# Altium PCB PCB1.PcbDoc (part 3 of 3)
Units mm, origin at the board's own origin, x right, y up, seen from the top; angles counter-clockwise.
Board outline 152.4 x 101.6 mm, 2 copper layers (Top Layer, Bottom Layer); 177 components, 83 nets, 484 pads, 115 vias.
Unrouted connection lines stored in the file: 7.
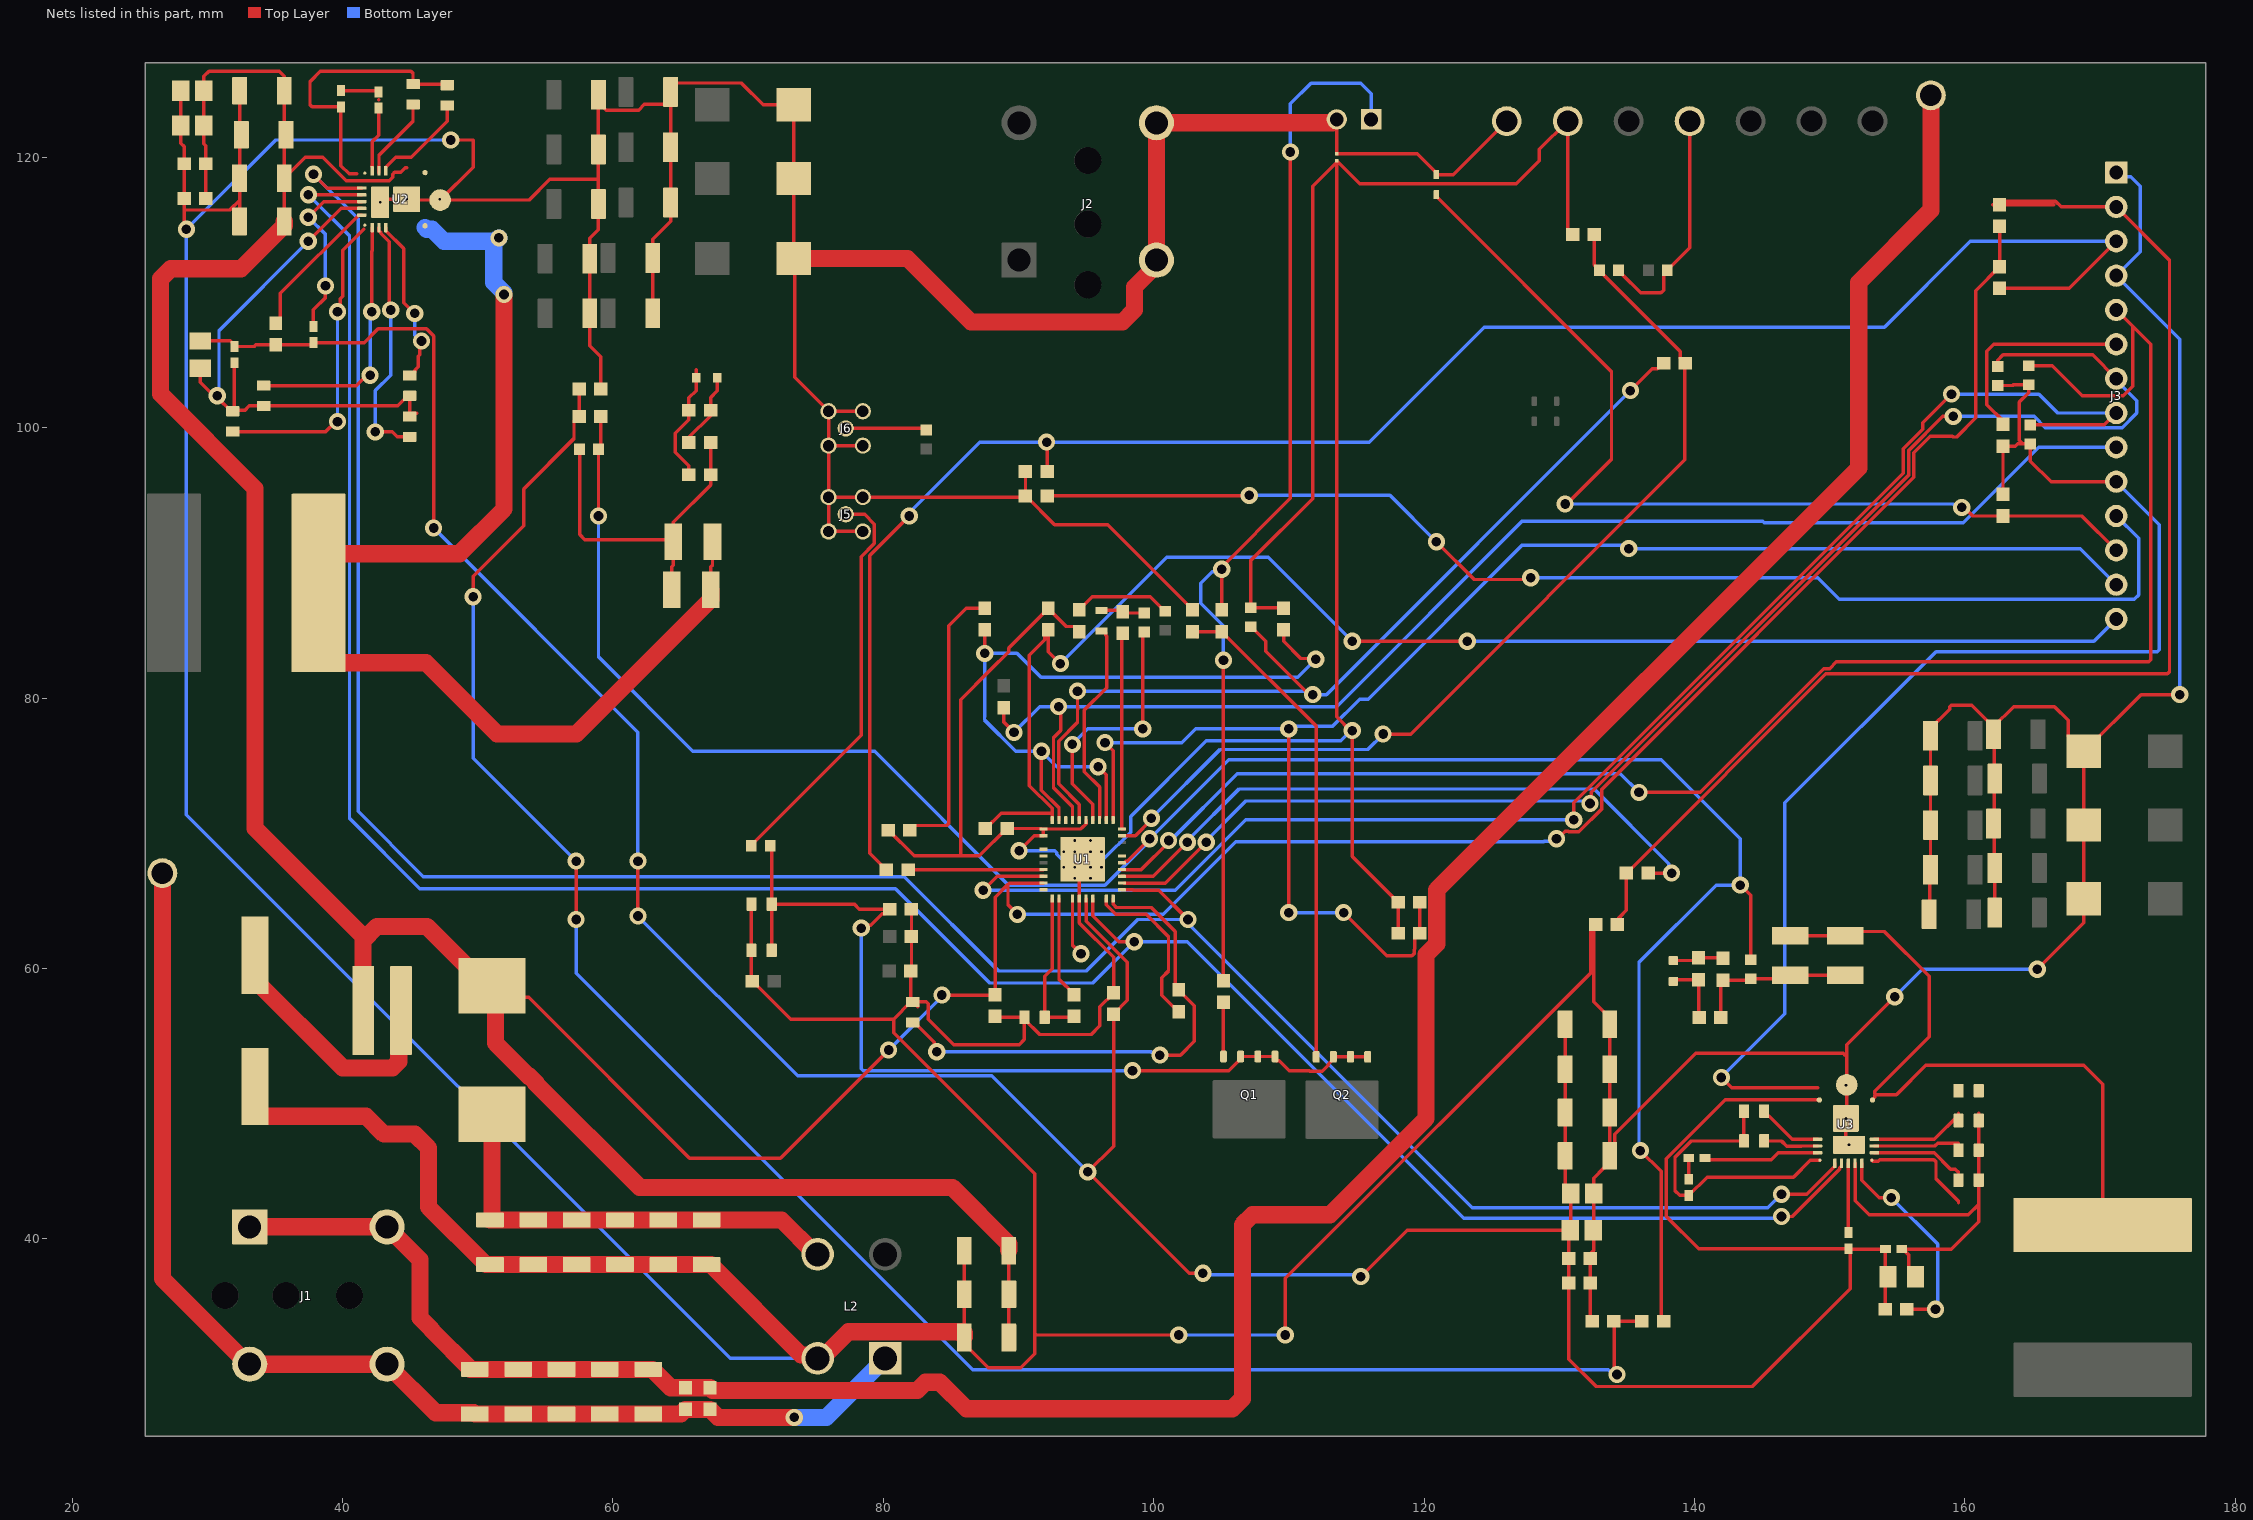
[diagram p2: the nets of this part, all layers, seen from the top]

## Via types
v1: diameter 1.27, hole 0.711, Top Layer to Bottom Layer, 97 vias
v2: diameter 0.5, hole 0.2, Top Layer to Bottom Layer, 18 vias

## Nets (pads, with @x,y where several pads share a name; then routed paths per layer and width w, separated by ;. In a path a pad name is that pad's centre, name@x,y a point inside that pad or via, vN(x,y) a via of type N, cw(c..) or ccw(c..) an arc to the next point about the centre after c; other vN are vias at no path point)
AGND: AGND_CTRL2.1 C32.2 C47.2 C51.2 C79.2 C80.2 NT2.2 R7.1 R17.1 R22.1 R54.1 U1.1 U1.2 U1.31 | length 199.4
  Top Layer w0.254: C80.2@80.353,70.231 80.378,70.231 82.283,68.326 85.725,68.326 ; v1(90.043,68.707) 91.158,69.822 U1.2@91.842,69.822 U1.1@91.842,70.322 ; R22.1@92.202,86.652 R22.1@92.202,86.627 ; R17.1@94.488,84.95 94.14,85.298 93.531,85.298 R22.1@92.202,86.627 ; U1.31@94.992,70.972 94.992,70.717 94.693,70.418 94.676,70.418 94.58,70.322 U1.1@91.842,70.322 ; C79.2@109.601,86.652 109.574,86.679 C32.2@107.188,86.679 107.188,90.183 111.76,94.755 111.76,117.856 113.538,119.634 ; C47.2@118.072,62.611 R7.1@118.072,64.897 118.047,64.897 117.699,65.245 117.699,65.27 114.681,68.288 v1(114.681,77.597) 114.554,77.597 113.538,78.613 113.538,119.634 ; R54.1@130.988,114.648 R54.1@130.988,114.543 ; R54.1@131.093,114.648 R54.1@130.988,114.543 ; 85.725,68.326 87.097,68.326 89.129,70.358 C51.2@89.154,70.358 91.635,70.358 91.671,70.322 U1.1@91.842,70.322 ; 85.725,68.326 85.725,79.883 87.884,82.042 89.281,83.439 89.281,83.706 R22.1@92.202,86.627 ; 113.538,119.634 NT2.2@113.538,119.761 115.248,118.051 126.814,118.051 128.524,119.761 128.524,120.587 AGND_CTRL2.1@130.619,122.682 130.619,114.648 130.968,114.3 R54.1@130.988,114.3 R54.1@130.988,114.543
  Bottom Layer w0.254: v1(90.043,68.707) 92.689,68.707 92.838,68.558 92.838,68.438 93.133,68.143 96.351,68.143 98.298,70.09 98.298,71.247 103.886,76.835 113.827,76.835 114.589,77.597 v1(114.681,77.597)
AGND2: C18.2 C19.2 R8.1 R10.1 R11.1 R15.1 U2.15 | length 42.9
  Top Layer w0.254: C19.2@29.464,104.394 29.464,103.357 30.459,102.362 v1(30.734,102.362) 30.734,102.237 31.752,101.219 R8.1@31.877,101.219 R8.1@31.935,101.277 ; C18.2@32.004,104.81 32.004,101.346 R8.1@31.935,101.277 ; v1(37.465,113.792) 39.901,116.228 U2.15@41.416,116.228 ; 45.484,101.074 45.206,101.074 R11.1@44.958,100.826 R15.1@44.958,102.362 44.833,102.362 44.083,101.612 R10.1@34.163,101.612 33.092,101.612 32.758,101.277 R8.1@31.935,101.277
  Bottom Layer w0.254: v1(30.734,102.362) 30.861,102.489 30.861,107.188 v1(37.465,113.792)
AGND3: C52.2 C53.2 R31.1 R32.1 R33.1 R40.1 U3.15 | length 29.6
  Top Layer w0.254: U3.15@151.873,45.596 151.873,42.818 152.908,41.783 160.26,41.783 161.024,42.547 ; C52.2@155.321,39.243 C52.2@155.421,39.243 ; C53.2@156.337,37.211 155.829,37.719 155.829,38.835 C52.2@155.421,39.243 ; 161.024,49.285 161.024,42.547 ; C52.2@155.421,39.243 159.004,39.243 161.024,41.263 161.024,42.547
COMP: C79.1 R60.2 U1.28 U1.35 | length 55.9
  Top Layer w0.254: v1(87.503,83.312) R60.2@87.503,85.052 ; v1(91.694,76.073) 91.694,73.183 92.992,71.885 U1.35@92.992,70.972 ; v1(95.885,74.93) 96.492,74.323 U1.28@96.492,70.972 ; C79.1@109.601,85.052 109.601,84.201 110.871,82.931 111.938,82.931 v1(111.989,82.88)
  Bottom Layer w0.254: v1(95.885,74.93) 92.837,74.93 v1(91.694,76.073) 89.789,76.073 87.481,78.381 87.481,78.591 87.503,78.613 v1(87.503,83.312) 89.885,83.312 91.663,81.534 110.642,81.534 v1(111.989,82.88)
EN1: R52.2 U1.20 | length 48
  Top Layer w0.254: U1.20@97.642,66.822 99.969,66.822 v1(102.489,69.342) ; R52.2@136.563,67.056 v1(138.303,67.056)
  Bottom Layer w0.254: v1(102.489,69.342) 102.489,69.463 106.305,73.279 132.588,73.279 138.109,67.758 138.109,67.25 v1(138.303,67.056)
EN2: R53.2 U1.6 | length 10.1
  Top Layer w0.254: R53.2@81.788,67.31 91.659,67.31 91.671,67.322 U1.6@91.842,67.322
FB: R50.1 R51.1 R54.2 U1.25 | length 72.7
  Top Layer w0.254: U1.25@97.642,69.822 98.651,69.822 99.822,70.993 v1(99.822,71.12) ; v1(116.967,77.343) 118.999,77.343 139.284,97.628 139.284,104.775 138.936,105.123 138.936,105.641 132.969,111.608 R51.1@132.969,111.633 132.969,111.658 132.588,112.039 R54.2@132.588,114.3
  Bottom Layer w0.254: v1(99.822,71.12) 104.902,76.2 115.824,76.2 v1(116.967,77.343)
GND: R23.1 R24.1 R25.1 | length 3.1
  Top Layer w0.254: R24.1@96.195,86.487 R23.1@97.686,86.487 ; R23.1@97.703,86.398 97.803,86.298 R25.1@99.314,86.298
HO1: U1.18 U2.12 U3.12 | length 184.5
  Top Layer w0.254: v1(37.846,118.745) 38.863,117.728 U2.12@41.416,117.728 ; U1.18@97.642,65.822 98.436,65.822 98.472,65.786 100.374,65.786 v1(102.533,63.627) ; v1(146.431,43.307) 148.305,43.307 150.373,45.375 U3.12@150.373,45.596
  Bottom Layer w0.254: v1(37.846,118.745) 41.148,115.443 41.148,71.628 45.974,66.802 81.534,66.802 88.519,59.817 94.996,59.817 98.806,63.627 v1(102.533,63.627) 102.533,63.352 102.848,63.036 102.848,63.014 123.571,42.291 145.415,42.291 v1(146.431,43.307)
HO2: U1.9
HS1: R4.1 R16.1 R18.1 U2.11 | length 21.5
  Top Layer w0.254: 41.066,118.778 40.48,118.778 39.878,119.38 R4.1@39.878,123.733 37.741,123.733 37.592,123.882 37.592,125.603 38.354,126.365 45.063,126.365 45.212,126.216 R18.1@45.212,125.414 R16.1@48.006,125.414
HS2: R28.1 R46.1 R47.1 U3.11 | length 22.2
  Top Layer w0.254: R46.1@143.649,49.448 R47.1@143.649,47.244 139.771,47.244 138.557,46.03 138.557,43.561 138.903,43.215 R28.1@139.573,43.215 140.935,44.577 147.32,44.577 148.564,45.821 U3.11@149.273,45.821
IMON1: C47.1 J3.13 R7.2 U1.27 | length 116.3
  Top Layer w0.254: v1(96.393,76.708) 96.992,76.109 U1.27@96.992,70.972 ; v1(109.982,64.135) v1(109.982,77.724) ; v1(114.046,64.135) 117.221,60.96 119.104,60.96 119.253,61.109 119.253,61.397 119.299,61.443 119.299,62.263 119.647,62.611 C47.1@119.672,62.611 R7.2@119.672,64.897
  Bottom Layer w0.254: v1(96.393,76.708) 102.086,76.708 103.102,77.724 v1(109.982,77.724) 110.176,77.918 113.224,77.918 115.239,79.933 115.874,79.933 127.265,91.324 134.863,91.324 v1(135.128,91.059) 168.529,91.059 J3.13@171.196,88.392 ; v1(109.982,64.135) v1(114.046,64.135)
IMON2: C51.1 J3.14 R22.2 U1.36 | length 108.2
  Top Layer w0.254: C51.1@87.554,70.358 87.579,70.358 88.716,71.495 92.492,71.495 ; U1.36@92.49,71.031 92.492,71.029 U1.36@92.492,70.972 ; U1.36@92.492,71.143 92.492,71.495 ; v1(93.091,82.55) 92.202,83.439 R22.2@92.202,85.052 91.953,84.802 91.953,84.32 90.805,83.172 90.805,73.533 92.492,71.846 92.492,71.495 ; v1(114.681,84.201) v1(123.19,84.201)
  Bottom Layer w0.254: v1(93.091,82.55) 100.965,90.424 108.458,90.424 v1(114.681,84.201) ; v1(123.19,84.201) 169.545,84.201 J3.14@171.196,85.852
ISNS1+: C49.2 C77.2 R20.1 R49.1 U1.22 | length 164.7
  Top Layer w0.254: v1(58.928,93.472) R20.1@58.928,98.425 59.093,98.59 C49.2@59.093,100.838 ; U1.22@97.815,67.824 97.934,67.943 98.042,67.943 v1(99.695,69.596) ; v1(135.998,46.535) 137.541,44.993 137.541,34.074 C77.2@137.706,33.909 ; v1(143.383,66.167) 144.145,65.405 R49.1@144.145,60.644
  Bottom Layer w0.254: v1(58.928,93.472) 58.928,83.058 65.913,76.073 79.35,76.073 89.256,66.167 96.393,66.167 99.695,69.469 v1(99.695,69.596) 105.537,75.438 137.541,75.438 143.383,69.596 v1(143.383,66.167) 141.605,66.167 135.89,60.452 135.89,46.644 v1(135.998,46.535)
ISNS2+: U1.4
LO1: U1.15 U2.13 U3.13 | length 183.5
  Top Layer w0.254: v1(37.472,117.228) U2.13@41.416,117.228 ; U1.15@95.492,65.172 95.492,63.893 97.409,61.976 v1(98.552,61.976) ; v1(146.431,41.656) 147.238,41.656 150.754,45.172 150.754,45.256 150.873,45.375 U3.13@150.873,45.596
  Bottom Layer w0.254: v1(37.472,117.228) 40.513,114.187 40.513,71.12 45.72,65.913 80.899,65.913 87.884,58.928 95.504,58.928 v1(98.552,61.976) 102.489,61.976 122.945,41.52 146.295,41.52 v1(146.431,41.656)
LO2: U1.12 | length 4.3
  Top Layer w0.254: U1.12@93.992,65.172 93.992,61.71 v1(94.615,61.087)
NetBODE2_1: BODE2.1 R36.1 R51.2 | length 17.4
  Top Layer w0.254: R51.2@134.369,111.633 134.369,111.608 134.642,111.335 134.667,111.335 136.02,109.982 137.519,109.982 137.714,110.177 137.714,111.36 R36.1@137.987,111.633 137.987,111.658 139.637,113.308 BODE2.1@139.637,122.682
NetC1_1: C1.1 R1.1 | length 19.2
  Top Layer w1.27: C1.1@33.528,60.984 33.528,59.134 40.01,52.652 43.688,52.652 44.156,53.121 44.156,54.926 44.321,55.091 R1.1@44.321,56.896
NetC5_2: C5.2 C9.2 C10.2 C11.2 C12.2 C13.2 L1.1 L2.3 | length 33
  Top Layer w1.27: L1.1@51.054,49.225 51.054,41.486 C13.2@50.969,41.401 ; L2.3@74.97,38.902 72.471,41.401 C10.2@66.929,41.401 C5.2@63.725,41.401 C9.2@60.521,41.401 C11.2@57.316,41.401 C12.2@54.112,41.401 C13.2@50.969,41.401 ; C13.2@50.969,41.401 C13.2@50.908,41.401 C13.2@50.969,41.401
NetC6_1: C6.1 C7.1 C8.1 C14.1 C15.1 C16.2 C17.2 GND1.1 J1.2 L2.1 | length 89.7
  Top Layer w1.27: GND1.1@26.67,67.056 26.67,37.07 J1.2@33.006,30.734 ; J1.2@33.133,30.734 J1.2@43.293,30.734 46.89,27.137 49.699,27.137 C8.1@49.784,27.052 C7.1@52.988,27.052 C6.1@56.192,27.052 C14.1@59.397,27.052 C15.1@62.611,27.052 65.026,27.052 C17.2@65.368,27.394 C16.2@67.183,27.394 67.78,26.797 v1(73.406,26.797)
  Bottom Layer w1.27: v1(73.406,26.797) 75.772,26.797 L2.1@80.137,31.162
NetC6_2: C6.2 C7.2 C8.2 C14.2 C15.2 C16.1 C17.1 J1.1 VIN1.1 | length 203.2
  Top Layer w1.27: J1.1@33.133,40.894 J1.1@43.293,40.894 45.72,38.467 45.72,34.163 46.609,33.274 46.609,33.222 49.479,30.352 C8.2@49.784,30.352 C7.2@52.988,30.352 C6.2@56.192,30.352 C14.2@59.397,30.352 C15.2@62.611,30.352 62.916,30.352 64.274,28.994 C17.1@65.368,28.994 C16.1@67.183,28.994 67.386,28.791 82.512,28.791 83.123,29.402 84.175,29.402 86.145,27.432 105.809,27.432 106.553,28.176 106.553,41.039 107.297,41.783 113.03,41.783 120.142,48.895 120.142,61.028 120.934,61.82 120.934,65.816 152.146,97.028 152.146,110.744 157.48,116.078 VIN1.1@157.48,124.587
NetC25_1: C25.1 R3.1 U1.17 | length 36.9
  Top Layer w0.254: R3.1@82.169,56.019 82.294,56.019 83.753,54.56 83.753,54.042 v1(83.947,53.848) ; U1.17@96.992,65.172 96.994,65.17 96.994,64.748 97.226,64.516 99.822,64.516 101.6,62.738 C25.1@101.6,58.585 ; v1(100.457,53.594) 101.981,53.594 102.997,54.61 102.997,57.252 101.854,58.395 C25.1@101.854,58.42
  Bottom Layer w0.254: v1(83.947,53.848) 99.8,53.848 99.86,53.788 100.263,53.788 v1(100.457,53.594)
NetC25_2: C25.2 U1.16 | length 12
  Top Layer w0.254: U1.16@96.492,65.172 96.494,65.17 96.494,64.709 97.195,64.008 99.441,64.008 101.092,62.357 101.092,59.817 100.584,59.309 100.584,58.026 101.6,57.01 C25.2@101.6,56.985
NetC29_1: C29.1 R4.2 | length 2.8
  Top Layer w0.254: R4.2@39.878,124.933 42.58,124.933 C29.1@42.672,124.841
NetC29_2: C29.2 U2.10 | length 4.5
  Top Layer w0.254: U2.10@42.164,119.342 42.183,119.361 42.183,119.571 42.187,119.575 42.187,120.375 42.197,120.386 42.197,121.172 42.672,121.646 C29.2@42.672,123.641
NetC33_1: C33.1 R13.2 R14.2 | length 8.8
  Top Layer w0.254: C33.1@65.621,96.52 65.621,97.193 64.618,98.196 64.618,99.581 65.621,100.584 R13.2@65.621,101.293 65.621,102.21 66.158,102.747 R14.2@66.158,103.697 66.158,104.292 66.167,104.301
NetC33_2: C33.2 R5.2 R6.2 R12.2 R20.2 | length 25.5
  Top Layer w0.254: R20.2@57.528,98.425 57.528,92.103 57.912,91.719 R5.2@64.463,91.719 ; R6.2@64.336,87.999 64.336,89.713 64.463,89.84 R5.2@64.463,91.567 R5.2@64.463,91.719 ; R12.2@67.221,98.906 C33.2@67.221,96.52 67.221,95.766 64.463,93.008 R5.2@64.463,91.719
NetC48_1: C48.1 U1.11 | length 7.6
  Top Layer w0.254: U1.11@92.992,65.172 92.992,59.217 94.107,58.102 C48.1@94.107,58.077
NetC48_2: C48.2 R21.1 U1.10 | length 11.2
  Top Layer w0.254: U1.10@92.492,65.172 92.492,59.98 91.936,59.424 R21.1@91.936,56.388 94.018,56.388 C48.2@94.107,56.477
NetC62_1: C62.1 R28.2 | length 1.6
  Top Layer w0.254: R28.2@139.573,44.415 C62.1@139.573,45.987
NetC62_2: C62.2 U3.10 | length 8.5
  Top Layer w0.254: C62.2@140.773,45.847 145.669,45.847 146.193,46.371 U3.10@149.098,46.371
NetC63_1: C63.1 R35.2 R37.2 | length 4.7
  Top Layer w0.254: R37.2@138.43,59.042 138.57,59.182 R35.2@140.298,59.182 140.298,56.425 C63.1@140.335,56.388
NetC63_2: C63.2 R29.2 R30.2 R34.2 R49.2 | length 12
  Top Layer w0.254: C63.2@141.935,56.388 141.935,58.966 R34.2@142.113,59.144 144.045,59.144 R49.2@144.145,59.244 146.8,59.244 R30.2@147.066,59.51 R29.2@151.13,59.51
NetC80_1: C80.1 R60.1 | length 20.9
  Top Layer w0.254: C80.1@81.953,70.231 82.301,70.579 84.687,70.579 84.836,70.728 84.836,85.344 86.144,86.652 R60.1@87.503,86.652
NetC81_1: C81.1 Q1.1 Q1.2 Q1.3 Q2.1 Q2.2 Q2.3 R62.2 R64.2 R65.2 | length 68.4
  Top Layer w0.254: R65.2@71.743,61.341 R64.2@71.743,64.77 ; R62.2@71.743,68.67 R64.2@71.743,64.77 ; v1(78.359,62.992) 78.553,63.186 79.061,63.186 79.916,64.041 80.107,64.041 80.264,64.198 C81.1@80.264,64.389 ; C81.1@80.48,64.389 C81.1@80.264,64.389 ; v1(98.425,52.451) 105.559,52.451 106.426,53.318 Q1.3@106.426,53.493 Q1.2@107.696,53.493 Q1.1@108.966,53.493 108.966,53.318 109.094,53.19 109.269,53.19 110.008,52.451 111.504,52.451 111.554,52.401 112.474,52.401 112.904,52.831 112.904,52.911 113.284,53.291 Q2.3@113.284,53.466 Q2.2@114.554,53.466 Q2.1@115.824,53.466 ; R64.2@71.743,64.77 77.851,64.77 78.232,64.389 C81.1@80.264,64.389
  Bottom Layer w0.254: v1(78.359,62.992) 78.359,52.6 78.508,52.451 v1(98.425,52.451)
NetJ3_2: J3.2 R41.1 R52.1 R55.2 | length 99.5
  Top Layer w0.254: R55.2@134.15,63.5 134.175,63.5 134.523,63.848 134.523,63.873 134.963,64.313 R52.1@134.963,67.056 134.988,67.056 149.72,81.788 174.984,81.788 175.133,81.937 175.133,112.395 J3.2@171.196,116.332 167.119,116.332 166.7,116.751 R41.1@162.687,116.751 ; 162.052,116.497 166.573,116.497
NetJ3_3: J3.3 R38.1 R53.1 R56.2 | length 138
  Top Layer w0.254: R53.1@80.226,67.31 78.994,68.542 78.994,90.551 v1(81.915,93.472) ; v1(92.075,98.933) 92.113,98.895 R56.2@92.113,96.774 R56.2@92.138,96.774 ; R38.1@162.56,110.325 167.729,110.325 J3.3@171.196,113.792
  Bottom Layer w0.254: v1(81.915,93.472) 81.915,93.726 87.122,98.933 v1(92.075,98.933) 115.951,98.933 124.46,107.442 154.051,107.442 160.401,113.792 J3.3@171.196,113.792
NetJ4_1: J4.1 R58.2 R59.1 | length 80.5
  Top Layer w0.254: R59.1@105.029,86.525 105.029,86.5 v1(105.029,89.535) 105.029,89.693 110.109,94.773 v1(110.109,120.396) ; R58.2@105.156,59.093 v1(105.156,82.804)
  Bottom Layer w0.254: v1(105.029,89.535) 104.835,89.341 104.327,89.341 103.483,88.497 103.483,87.017 105.156,85.344 v1(105.156,82.804) ; v1(110.109,120.396) 110.109,123.952 111.633,125.476 115.316,125.476 116.078,124.714 J4.1@116.078,122.809
NetJ5_1: J5.1 R62.1 | length 30
  Top Layer w0.254: R62.1@70.231,69.088 70.231,69.113 78.359,77.241 78.359,90.455 79.34,91.436 79.34,92.872 78.613,93.599 J5.1@77.216,93.599
NetJ6_1: J6.1 R63.2 | length 6
  Top Layer w0.254: J6.1@77.216,99.949 83.061,99.949 R63.2@83.185,99.825
NetL3_1: L3.1 R5.1 R6.1 U2.5 | length 87
  Top Layer w0.254: R6.1@67.236,87.999 67.236,89.713 67.363,89.84 R5.1@67.363,91.567
  Top Layer w1.27: v1(51.943,109.855) 51.943,93.98 48.641,90.678 39.592,90.678 38.227,89.313 L3.1@38.227,88.519 38.227,83.979 39.592,82.614 46.164,82.614 51.435,77.343 57.28,77.343 67.236,87.299 R6.1@67.236,87.999
  Bottom Layer w1.27: 46.101,114.808 46.228,114.681 46.609,114.681 47.498,113.792 51.308,113.792 v1(51.562,114.046) ; 51.181,113.538 51.181,110.744 51.943,109.982 v1(51.943,109.855)
NetL4_1: L4.1 R29.1 R30.1 U3.5 | length 51.3
  Top Layer w0.254: R30.1@147.066,62.41 R29.1@151.13,62.41 151.458,62.738 154.029,62.738 157.353,59.414 157.353,54.965 153.324,50.935 153.324,50.777 153.428,50.673 154.94,50.673 157.099,52.832 168.783,52.832 170.18,51.435 L4.1@170.18,41.021 ; U3.5@153.167,50.281 153.167,50.319 153.324,50.476 153.324,50.618
NetQ1_4: Q1.4 R58.1 | length 4
  Top Layer w0.254: Q1.4@105.156,53.493 R58.1@105.156,57.493
NetQ2_4: Q2.4 R59.2 R61.2 | length 37
  Top Layer w0.254: R61.2@103.218,84.552 102.87,84.9 R61.2@102.87,84.925 104.902,84.925 R59.2@104.966,84.989 ; R59.2@105.029,84.925 112.014,77.94 Q2.4@112.014,53.466
NetR2_1: R2.1 U2.14 | length 13.4
  Top Layer w0.254: v1(37.465,115.57) 38.623,116.728 U2.14@41.416,116.728 ; R2.1@37.846,107.499 37.846,108.712 38.735,109.601 v1(38.735,110.49)
  Bottom Layer w0.254: v1(37.465,115.57) 38.735,114.3 v1(38.735,110.49)
NetR8_2: R8.2 U2.1 | length 23.1
  Top Layer w0.254: R8.2@31.877,99.719 38.746,99.719 39.484,100.457 v1(39.624,100.457) ; v1(39.624,108.585) 39.818,108.779 39.818,109.541 40.005,109.728 40.005,113.117 41.566,114.678
  Bottom Layer w0.254: v1(39.624,100.457) v1(39.624,108.585)
NetR9_1: R9.1 R17.2 | length 7.2
  Top Layer w0.254: R17.2@94.488,86.525 94.488,86.55 94.836,86.898 94.861,86.898 95.466,87.503 99.735,87.503 100.813,86.425 R9.1@100.838,86.425
NetR10_2: R10.2 U2.2 | length 19.2
  Top Layer w0.254: R10.2@34.163,103.112 41.009,103.112 41.783,103.886 v1(42.037,103.886) ; v1(42.164,108.585) 42.164,113.051 42.191,113.078 U2.2@42.191,114.803
  Bottom Layer w0.254: v1(42.037,103.886) 42.037,108.458 v1(42.164,108.585)
NetR11_2: R11.2 U2.3 | length 18.6
  Top Layer w0.254: v1(42.418,99.695) 43.676,99.695 44.045,99.326 R11.2@44.958,99.326 ; U2.3@42.691,114.803 42.691,114.582 42.81,114.463 42.81,114.379 43.438,113.752 43.438,108.835 v1(43.561,108.712)
  Bottom Layer w0.254: v1(42.418,99.695) 42.418,102.753 43.561,103.896 v1(43.561,108.712)
NetR12_1: R12.1 R13.1 R14.1 | length 5.7
  Top Layer w0.254: R12.1@65.621,98.906 65.621,99.289 67.221,100.889 R13.1@67.221,101.293 67.221,102.235 67.708,102.722 R14.1@67.708,103.697
NetR15_2: R15.2 U2.4 | length 12.8
  Top Layer w0.254: U2.4@43.191,114.803 43.191,114.582 44.517,113.256 44.517,109.253 45.312,108.458 v1(45.339,108.458) ; R15.2@44.958,103.862 45.083,103.862 45.331,104.11 45.331,104.235 45.593,104.497 45.593,105.277 45.72,105.404 45.72,106.299 v1(45.841,106.42)
  Bottom Layer w0.254: v1(45.339,108.458) 45.19,108.458 45.339,108.309 45.339,106.829 45.748,106.42 v1(45.841,106.42)
NetR16_2: R16.2 U2.8 | length 7.1
  Top Layer w0.254: U2.8@43.205,119.253 43.205,119.278 43.929,120.002 45.09,120.002 47.752,122.665 R16.2@47.752,123.837
NetR18_2: R18.2 U2.9 | length 6.1
  Top Layer w0.254: U2.9@42.691,118.876 42.691,119.361 42.697,119.367 42.697,120.167 45.212,122.682 R18.2@45.212,123.914
NetR19_2: R19.2 U2.16 | length 10.8
  Top Layer w0.254: R19.2@35.052,107.734 35.4,108.082 35.4,109.933 41.195,115.728 U2.16@41.416,115.728
NetR23_2: R23.2 U1.26 | length 14.7
  Top Layer w0.254: R23.2@97.703,84.798 97.642,84.737 U1.26@97.642,70.322 U1.26@97.813,70.322
NetR24_2: R24.2 U1.29 | length 15.2
  Top Layer w0.254: U1.29@95.992,71.145 95.992,73.426 94.869,74.549 94.869,79.121 96.52,80.772 96.52,84.566 96.441,84.646 96.441,84.836 96.314,84.963 R24.2@96.123,84.963
NetR25_2: R25.2 U1.30 | length 19.1
  Top Layer w0.254: v1(93.98,76.581) 93.98,73.66 95.492,72.148 U1.30@95.492,70.972 ; v1(99.187,77.724) 99.187,84.796 R25.2@99.289,84.898
  Bottom Layer w0.254: v1(93.98,76.581) 95.123,77.724 v1(99.187,77.724)
NetR27_1: R27.1 U3.14 | length 5.1
  Top Layer w0.254: U3.14@151.373,45.596 151.373,45.375 151.384,45.364 R27.1@151.384,40.478
NetR31_2: R31.2 U3.1 | length 8.6
  Top Layer w0.254: U3.1@153.123,45.821 153.198,45.746 153.598,45.746 153.699,45.847 157.712,45.847 157.861,45.698 157.861,44.46 159.524,42.797 159.524,42.672
NetR32_2: R32.2 U3.2 | length 6.9
  Top Layer w0.254: U3.2@153.298,46.371 157.727,46.371 158.934,45.164 159.276,45.164 159.524,44.916 159.524,44.876
NetR33_2: R33.2 U3.3 | length 6.3
  Top Layer w0.254: U3.3@153.298,46.871 157.774,46.871 157.984,47.081 159.524,47.081
NetR34_1: R34.1 R35.1 R37.1 | length 3.8
  Top Layer w0.254: R37.1@138.43,60.592 140.108,60.592 R35.1@140.298,60.782 R35.1@140.335,60.782 ; R35.1@140.335,60.757 R35.1@140.335,60.782 ; R34.1@142.113,60.744 142.075,60.782 R35.1@140.335,60.782
NetR40_2: R40.2 U3.4 | length 7.1
  Top Layer w0.254: U3.4@153.298,47.371 157.735,47.371 159.524,49.16 159.524,49.285
NetR46_2: R46.2 U3.8 | length 4.9
  Top Layer w0.254: R46.2@145.149,49.448 145.149,49.323 145.397,49.075 145.522,49.075 147.226,47.371 U3.8@149.098,47.371
NetR47_2: R47.2 U3.9 | length 4.1
  Top Layer w0.254: R47.2@145.149,47.244 146.431,47.244 146.812,46.863 147.904,46.863 147.912,46.871 U3.9@149.098,46.871
NetR48_2: R48.2 U3.16 | length 15.8
  Top Layer w0.254: U3.16@152.373,45.596 152.373,44.35 153.67,43.053 v1(154.559,43.053) ; R48.2@155.702,34.798 v1(157.823,34.798)
  Bottom Layer w0.254: v1(154.559,43.053) 157.988,39.624 157.988,34.963 v1(157.823,34.798)
nFAULT1: J3.7 R44.1 U1.19 | length 105
  Top Layer w0.254: U1.19@97.815,66.322 100.866,66.322 v1(103.886,69.342) ; v1(132.264,72.206) 132.369,72.311 132.369,73.03 155.829,96.489 155.829,98.298 158.369,100.838 v1(159.131,100.838) ; R44.1@162.433,104.524 162.433,105.004 162.814,105.385 169.443,105.385 J3.7@171.196,103.632
  Bottom Layer w0.254: v1(103.886,69.342) 103.886,69.466 106.81,72.39 132.08,72.39 v1(132.264,72.206) ; v1(159.131,100.838) 165.112,100.838 165.937,100.013 171.643,100.013 172.72,101.09 172.72,101.981 171.196,103.505 J3.7@171.196,103.632
nFAULT2: J3.8 R45.1 U1.7 | length 113.3
  Top Layer w0.254: v1(87.376,65.786) 88.412,66.822 U1.7@91.842,66.822 ; v1(131.064,70.993) 131.064,72.263 155.448,96.647 155.448,98.456 156.893,99.901 156.893,100.378 v1(159.004,102.489) ; R45.1@164.846,100.206 170.31,100.206 J3.8@171.196,101.092
  Bottom Layer w0.254: v1(87.376,65.786) 101.587,65.786 106.794,70.993 v1(131.064,70.993) ; v1(159.004,102.489) 165.481,102.489 166.878,101.092 J3.8@171.196,101.092
OffSheet: U1.34
PFM/SYNC: J3.11 R57.2 | length 90.7
  Top Layer w0.254: R57.2@92.113,94.959 107.024,94.959 v1(107.061,94.996) ; v1(120.904,91.567) 123.698,88.773 127.762,88.773 v1(127.889,88.9)
  Bottom Layer w0.254: v1(107.061,94.996) 117.475,94.996 v1(120.904,91.567) ; v1(127.889,88.9) 149.11,88.9 150.697,87.313 172.53,87.313 172.847,87.63 172.847,91.821 J3.11@171.196,93.472
PG1: J3.5 R42.1 U1.21 | length 124
  Top Layer w0.254: U1.21@97.642,67.322 99.091,67.322 101.098,69.329 v1(101.098,69.469) ; v1(135.89,73.025) 140.418,73.025 149.562,82.169 149.987,82.169 150.495,82.677 173.587,82.677 173.736,82.826 173.736,106.172 172.415,107.493 ; R42.1@164.719,104.586 166.457,104.586 168.681,102.362 171.704,102.362 172.415,103.073 172.415,107.493 ; J3.5@171.196,108.712 172.415,107.493
  Bottom Layer w0.254: v1(101.098,69.469) 101.238,69.469 106.191,74.422 134.493,74.422 v1(135.89,73.025)
PGND: C1.2 C2.1 C3.1 C4.1 C5.1 C9.1 C10.1 C11.1 C12.1 C13.1 C20.1 C21.1 C22.1 C23.1 C24.2 C26.2 C27.2 C28.2 C30.2 C31.2 C34.1 C35.1 C36.1 C37.1 C38.1 C39.1 C40.1 C41.1 C42.1 C43.1 C44.2 C45.2 C46.2 C50.2 C54.1 C55.1 C56.1 C57.1 C58.2 C59.2 C60.2 C61.2 C64.1 C65.1 C66.1 C67.1 C68.1 C69.1 C70.1 C71.1 C72.1 C73.2 C74.2 C75.2 C76.1 C78.2 C81.2 C82.2 C83.2 C84.2 J2.2 J3.1 J3.4 J4.2 J5.2 J5.3 J5.4 J5.5 J6.2 J6.3 J6.4 J6.5 L2.2 NT2.1 PGND1.1 R3.2 R21.2 R55.1 R56.1 R57.1 R61.1 R64.1 R65.1 RT1.1 U1.13 U1.37 U2.6 U3.6 | length 790.8
  Top Layer w0.254: C27.2@28.04,124.923 28.04,123.622 C28.2@28.039,122.362 28.039,121.046 28.283,120.802 C24.2@28.283,119.527 C26.2@28.283,116.967 28.283,116.103 ; v1(28.448,114.681) 28.283,114.846 28.283,116.103 ; C22.1@32.386,115.316 32.386,116.84 ; C23.1@32.386,124.929 C20.1@32.386,118.462 32.386,116.84 ; v2(42.781,116.678) 43.003,116.9 44.731,116.9 v2(44.734,116.903) 44.794,116.844 47.122,116.844 v2(47.181,116.903) 47.279,116.903 49.657,119.281 49.657,121.285 v1(48.006,121.285) ; U2.6@47.219,116.844 53.819,116.844 55.339,118.364 58.927,118.364 ; C39.1@58.927,124.626 C39.1@58.927,124.076 ; C50.2@59.093,102.87 59.093,105.245 58.285,106.053 C41.1@58.285,108.469 C36.1@58.285,112.509 58.285,114.013 58.927,114.655 C34.1@58.927,116.548 58.927,118.364 ; C37.1@62.939,108.469 C40.1@62.939,112.562 62.939,113.944 64.262,115.267 C43.1@64.262,116.655 C35.1@64.262,120.748 C38.1@64.262,124.341 ; R64.1@70.243,64.77 R65.1@70.243,61.341 70.243,59.132 C83.2@70.32,59.055 70.345,59.055 73.139,56.261 80.77,56.261 ; C46.2@73.383,112.522 C45.2@73.383,118.437 C44.2@73.383,123.892 71.104,123.892 69.494,125.501 64.262,125.501 C38.1@64.262,124.841 C38.1@64.262,124.341 ; C46.2@73.433,112.522 73.433,103.732 J6.2@75.946,101.219 ; J5.4@78.486,92.329 J5.5@75.946,92.329 J5.2@75.946,94.869 ; J6.4@78.486,98.679 J6.5@75.946,98.679 ; J6.3@78.486,101.219 J6.2@75.946,101.219 ; R3.2@82.042,57.533 80.77,56.261 ; R3.2@82.042,57.658 C84.2@82.042,59.817 82.08,59.855 C82.2@82.08,62.357 C81.2@82.08,64.389 ; R3.2@82.169,57.519 82.181,57.531 83.163,57.531 83.312,57.382 83.312,56.261 85.217,54.356 90.043,54.356 90.436,54.749 R21.2@90.436,56.263 ; R3.2@82.542,57.158 R3.2@82.542,57.271 ; C2.1@85.98,32.766 86.403,32.343 86.403,31.834 87.757,30.48 90.17,30.48 91.186,31.496 91.186,33.02 ; C2.1@85.98,33.045 C3.1@85.98,39.174 ; C30.2@88.265,56.477 88.354,56.388 90.311,56.388 R21.2@90.436,56.263 ; R57.1@90.513,94.959 90.424,94.869 J5.3@78.486,94.869 J5.2@75.946,94.869 ; R57.1@90.513,94.996 R56.1@90.513,96.774 ; R57.1@90.538,94.959 92.66,92.837 96.583,92.837 102.87,86.55 R61.1@102.87,86.525 ; v2(94.167,66.672) 94.369,66.672 94.492,66.549 U1.13@94.492,65.172 94.492,63.369 97.028,60.833 C31.2@97.028,58.204 97.028,58.179 96.012,57.163 96.012,55.753 95.377,55.118 91.581,55.118 R21.2@90.436,56.263 ; v2(94.167,68.647) v2(94.167,69.472) ; v1(101.854,32.893) 91.313,32.893 91.186,33.02 ; v1(109.728,32.893) 109.728,37.083 132.304,59.659 132.304,62.898 132.652,63.246 R55.1@132.677,63.246 ; J4.2@113.538,122.809 113.538,120.777 NT2.1@113.538,120.269 119.493,120.269 120.904,118.858 RT1.1@120.904,118.723 122.152,118.723 PGND1.1@126.111,122.682 ; C58.2@132.292,36.732 132.292,34.04 C78.2@132.423,33.909 ; C58.2@132.292,37.084 C59.2@132.292,38.548 132.292,38.899 132.536,39.143 C60.2@132.536,43.359 132.536,44.49 133.293,45.247 133.307,45.247 133.73,45.67 C54.1@133.73,46.145 ; R55.1@132.55,63.119 132.55,57.535 133.73,56.355 C55.1@133.73,55.88 C57.1@133.73,52.554 C56.1@133.73,49.35 C54.1@133.73,46.145 ; 151.13,53.594 151.003,53.721 140.081,53.721 134.103,47.743 134.103,46.519 C54.1@133.73,46.145 ; v2(151.198,51.361) 151.257,51.302 151.257,48.973 v2(151.198,48.914) 151.201,48.911 151.201,47.183 v2(151.423,46.961) ; U3.6@151.257,51.399 151.257,54.356 v1(154.813,57.912) ; C71.1@157.354,64.022 157.404,64.072 157.404,67.252 C67.1@157.454,67.302 C64.1@157.454,70.606 C76.1@157.454,73.911 C68.1@157.454,77.216 157.454,77.766 158.877,79.189 158.877,79.353 158.993,79.469 160.518,79.469 C65.1@162.108,77.879 ; C72.1@162.208,64.135 C69.1@162.208,67.44 162.158,67.49 162.158,70.67 C66.1@162.108,70.72 162.158,70.77 162.158,73.999 C70.1@162.208,74.049 162.158,74.099 162.158,77.279 C65.1@162.108,77.329 C65.1@162.108,77.879 ; v1(165.354,59.944) 168.783,63.373 C73.2@168.783,65.164 C75.2@168.783,70.619 C74.2@168.783,76.073 ; v1(175.895,80.264) 173.024,80.264 168.833,76.073 C74.2@168.783,76.073 ; 28.283,116.103 31.649,116.103 32.386,116.84 ; 58.927,118.364 C42.1@58.927,120.587 C39.1@58.927,124.076 ; C39.1@58.927,124.076 59.516,123.487 61.897,123.487 62.327,123.917 63.839,123.917 C38.1@64.262,124.341 ; J5.2@75.946,94.869 J6.5@75.946,98.679 ; J6.5@75.946,98.679 J6.2@75.946,101.219 ; 80.77,56.261 80.77,55.247 91.186,44.831 91.186,33.02 ; C65.1@162.108,77.879 163.604,79.375 166.624,79.375 167.635,78.364 167.635,77.171 168.733,76.073 C74.2@168.783,76.073
  Top Layer w1.27: C1.2@33.528,51.284 33.528,49.434 33.893,49.069 41.736,49.069 43.053,47.752 45.339,47.752 46.355,46.736 46.355,42.349 C13.1@50.603,38.101 ; C13.1@50.908,38.101 C12.1@54.112,38.101 C11.1@57.316,38.101 C9.1@60.521,38.101 C5.1@63.725,38.101 C10.1@66.929,38.101 ; C10.1@67.234,38.101 73.914,31.421 L2.2@74.751,31.421 ; C46.2@73.383,112.522 73.433,112.522 81.788,112.522 86.487,107.823 97.681,107.823 98.579,108.721 98.579,110.411 100.203,112.035 J2.2@100.203,112.395 J2.2@100.203,122.555 113.222,122.555 113.476,122.809 J4.2@113.538,122.809 ; L2.2@75.137,31.162 75.446,31.162 77.415,33.13 85.895,33.13 85.98,33.045 C2.1@85.98,32.766
  Bottom Layer w0.254: v1@47.879,121.412 v1(48.006,121.285) 35.052,121.285 v1(28.448,114.681) 28.448,71.374 68.66,31.162 L2.2@75.137,31.162 ; v1(101.854,32.893) v1(109.728,32.893) ; v1(154.813,57.912) 156.845,59.944 v1(165.354,59.944) ; J3.1@171.196,118.872 171.491,118.577 172.253,118.577 172.974,117.856 172.974,113.03 J3.4@171.196,111.252 175.895,106.553 v1(175.895,80.264)
  other v2: 95.317,66.672 93.342,67.497 94.167,67.497 95.317,67.497 96.142,67.497 93.342,68.647 95.317,68.647 96.142,68.647 95.317,69.472
SYNCOUT: J3.9 R26.1 U1.33 | length 101.8
  Top Layer w0.254: R26.1@88.9,79.299 88.9,78.232 v1(89.662,77.47) ; v1(92.964,79.375) 93.13,79.209 93.13,77.608 92.583,77.061 92.583,73.371 93.992,71.962 U1.33@93.992,70.972
  Bottom Layer w0.254: v1(89.662,77.47) 91.567,79.375 v1(92.964,79.375) 113.538,79.375 127.236,93.073 145.046,93.073 145.155,92.964 159.88,92.964 165.468,98.552 J3.9@171.196,98.552
TEMPSENSE1: J3.12 R43.1 RT1.2 | length 71.9
  Top Layer w0.254: RT1.2@120.904,117.243 120.904,117.108 133.858,104.154 133.858,97.663 130.556,94.361 v1(130.429,94.361) ; v1(159.766,94.107) 159.933,94.107 160.568,93.472 168.656,93.472 J3.12@171.196,90.932
  Bottom Layer w0.254: v1(130.429,94.361) 159.109,94.361 159.169,94.301 159.572,94.301 v1(159.766,94.107)
TEMPSENSE2: J3.6 R39.1 | length 15.7
  Top Layer w0.254: R39.1@162.814,100.241 162.814,100.508 161.62,101.702 161.62,105.664 162.128,106.172 J3.6@171.196,106.172
VCC: C18.1 C19.1 C31.1 C52.1 C53.1 C54.2 C55.2 C56.2 C57.2 C58.1 C59.1 C60.1 C61.1 J3.10 R2.2 R19.1 R27.2 R39.2 R42.2 R43.2 R44.2 R45.2 R48.1 U1.14 U3.7 | length 359.7
  Top Layer w0.254: C19.1@29.464,106.426 31.688,106.426 32.004,106.11 C18.1@32.004,106.01 33.452,106.01 33.576,106.134 R19.1@35.052,106.134 37.681,106.134 R2.2@37.846,106.299 41.609,106.299 42.619,107.309 46.209,107.309 46.73,106.788 46.73,96.653 46.736,96.647 v1(46.736,92.583) ; v1(61.849,63.881) v1(61.849,67.945) ; U1.14@94.992,65.172 94.992,63.504 98.044,60.452 98.044,57.645 97.028,56.629 97.028,46.863 v1(95.123,44.958) 102.616,37.465 v1(103.632,37.465) ; v1(115.316,37.211) 118.745,40.64 C61.1@130.692,40.64 ; C55.2@130.43,55.88 C57.2@130.43,52.554 C56.2@130.43,49.35 C54.2@130.43,46.145 130.43,43.765 C60.1@130.836,43.359 130.836,40.992 130.692,40.848 C61.1@130.692,40.64 ; C58.1@130.692,36.732 130.692,31.106 132.715,29.083 144.272,29.083 151.511,36.322 151.511,39.151 R27.2@151.419,39.243 ; C58.1@130.692,37.084 C59.1@130.692,38.548 C61.1@130.692,40.64 ; v1(141.986,51.943) 142.748,51.181 149.098,51.181 ; U3.7@149.229,50.281 142.269,50.281 137.922,45.934 137.922,41.656 140.3,39.278 R27.2@151.384,39.278 R27.2@151.419,39.243 ; R48.1@154.102,34.798 154.102,37.008 C53.1@154.305,37.211 154.121,37.395 C52.1@154.121,39.243 R27.2@151.419,39.243 ; R44.2@162.433,103.124 163.525,103.124 163.587,103.186 R42.2@164.719,103.186 164.719,102.591 164.033,101.905 164.033,99.06 164.287,98.806 ; R43.2@162.814,95.072 R39.2@162.814,98.641 163.728,98.641 163.893,98.806 164.287,98.806 ; J3.10@171.196,96.012 166.37,96.012 164.846,97.536 R45.2@164.846,98.806 164.287,98.806
  Bottom Layer w0.254: v1(46.736,92.583) 61.849,77.47 v1(61.849,67.945) ; v1(61.849,63.881) 73.66,52.07 88.011,52.07 v1(95.123,44.958) ; v1(103.632,37.465) 103.759,37.338 115.189,37.338 v1(115.316,37.211) ; v1(141.986,51.943) 146.685,56.642 146.685,72.263 157.861,83.439 174.222,83.439 174.371,83.588 174.371,92.837 J3.10@171.196,96.012
VDDA: C32.1 R50.2 U1.32 | length 71.4
  Top Layer w0.254: v1@94.362,80.517 94.362,79.38 94.371,79.372 94.371,79.162 94.361,79.152 94.361,78.219 92.964,76.822 92.964,73.66 94.492,72.132 U1.32@94.492,70.972 ; C32.1@107.188,85.279 107.213,85.279 108.289,84.203 108.289,83.481 111.506,80.264 v1(111.76,80.264) ; v1(135.255,102.743) 136.865,104.353 137.262,104.353 137.684,104.775 R50.2@137.709,104.775
  Bottom Layer w0.254: v1(94.361,80.518) 111.103,80.518 111.163,80.458 111.566,80.458 v1(111.76,80.264) 112.776,80.264 v1(135.255,102.743)
VIN: C2.2 C3.2 C4.2 C20.2 C21.2 C22.2 C23.2 C24.1 C26.1 C27.1 C28.1 C30.1 L1.2 R1.2 R38.2 R41.2 U1.8 U2.7 | length 338.6
  Top Layer w0.254: C26.1@29.883,116.967 C24.1@29.883,119.527 29.883,120.853 29.739,120.997 C28.1@29.739,122.362 29.739,123.622 C27.1@29.74,124.923 29.74,125.984 30.121,126.365 35.306,126.365 35.686,125.985 C23.2@35.686,124.929 35.686,121.666 C20.2@35.686,118.462 ; C22.2@35.686,115.316 C20.2@35.686,118.462 ; 44.744,119.219 44.633,119.219 44.308,118.894 43.843,118.894 43.697,118.748 43.697,118.525 43.443,118.27 40.269,118.27 38.525,120.015 37.239,120.015 C20.2@35.686,118.462 ; L1.2@51.054,58.725 L1.2@51.308,58.471 ; L1.2@51.907,57.872 53.761,57.872 65.659,45.974 72.39,45.974 v1(80.391,53.975) ; v1(84.328,58.039) 88.227,58.039 C30.1@88.265,58.077 88.265,65.278 89.218,66.23 ; C2.2@89.28,32.766 89.28,35.97 C3.2@89.28,39.174 ; v1(89.916,64.008) 89.218,64.706 89.218,66.23 ; U1.8@91.842,66.322 89.309,66.322 89.218,66.23 ; v1(129.794,69.596) 129.908,69.596 130.451,70.139 130.661,70.139 130.696,70.104 131.432,70.104 133.153,71.825 133.153,73.274 156.21,96.331 156.21,98.14 157.432,99.362 159.083,99.362 159.131,99.314 159.385,99.314 160.798,100.727 160.798,110.138 162.56,111.9 R38.2@162.56,111.925 R41.2@162.56,114.897
  Top Layer w1.27: C22.2@35.686,115.258 35.686,114.953 32.493,111.76 27.287,111.76 26.543,111.016 26.543,102.489 33.528,95.504 33.528,70.368 41.521,62.375 R1.2@41.521,56.896 ; 41.521,62.095 42.545,63.119 46.235,63.119 50.629,58.725 L1.2@51.054,58.725 ; L1.2@51.308,58.471 51.308,57.872 51.308,54.483 53.754,52.037 53.821,52.037 54.291,51.567 54.291,51.5 61.976,43.815 85.09,43.815 89.28,39.625 C3.2@89.28,39.174
  Bottom Layer w0.254: v1(80.391,53.975) 84.328,57.912 v1(84.328,58.039) ; v1(89.916,64.008) 100.711,64.008 106.073,69.37 128.856,69.37 128.887,69.402 129.6,69.402 v1(129.794,69.596)
VOUT: C49.1 C50.1 C77.1 C78.1 | length 145
  Top Layer w0.254: v1(49.657,87.503) 49.657,89.027 53.388,92.758 53.388,95.47 57.12,99.201 57.12,100.49 57.468,100.838 C49.1@57.493,100.838 C50.1@57.493,102.87 ; v1(57.277,63.627) v1(57.277,67.945) ; v1(134.267,29.972) 134.267,30.247 134.062,30.452 134.062,33.87 C78.1@134.023,33.909 C77.1@136.106,33.909
  Bottom Layer w0.254: v1(49.657,87.503) 49.657,75.565 v1(57.277,67.945) ; v1(57.277,63.627) 57.277,59.657 86.601,30.332 133.632,30.332 133.992,29.972 v1(134.267,29.972)
VOUT1: U1.23
VOUT2: U1.3
pads on no net: AGND_CTRL1.1 BODE1.1 C34.2 C35.2 C36.2 C37.2 C38.2 C39.2 C40.2 C41.2 C42.2 C43.2 C44.1 C45.1 C46.1 C64.2 C65.2 C66.2 C67.2 C68.2 C69.2 C70.2 C71.2 C72.2 C73.1 C74.1 C75.1 C76.2 C82.1 C83.1 C84.1 J1. J2. J2.1 L2.4 L3.2 L4.2 Q1.5 Q1.6 Q1.7 Q1.8 Q1.9 Q2.5 Q2.6 Q2.7 Q2.8 Q2.9 R9.2 R26.2 R36.2 R63.1 RT2.1 RT2.2 RT3.1 RT3.2 U1.5 U1.24 VOUT_BODE.1 VOUT_PWR1.1
copper on no net: | length 0

## Polygon pours and split planes (outlines as drawn)
AGND on Bottom Layer "AGND_L02_P001" (solid, remove dead copper, pour order 1): 25.4,127 177.165,127 177.927,126.238 177.927,25.527 25.4,25.527